# EAGLE board untitled (1) (EAGLE 9.6.2)
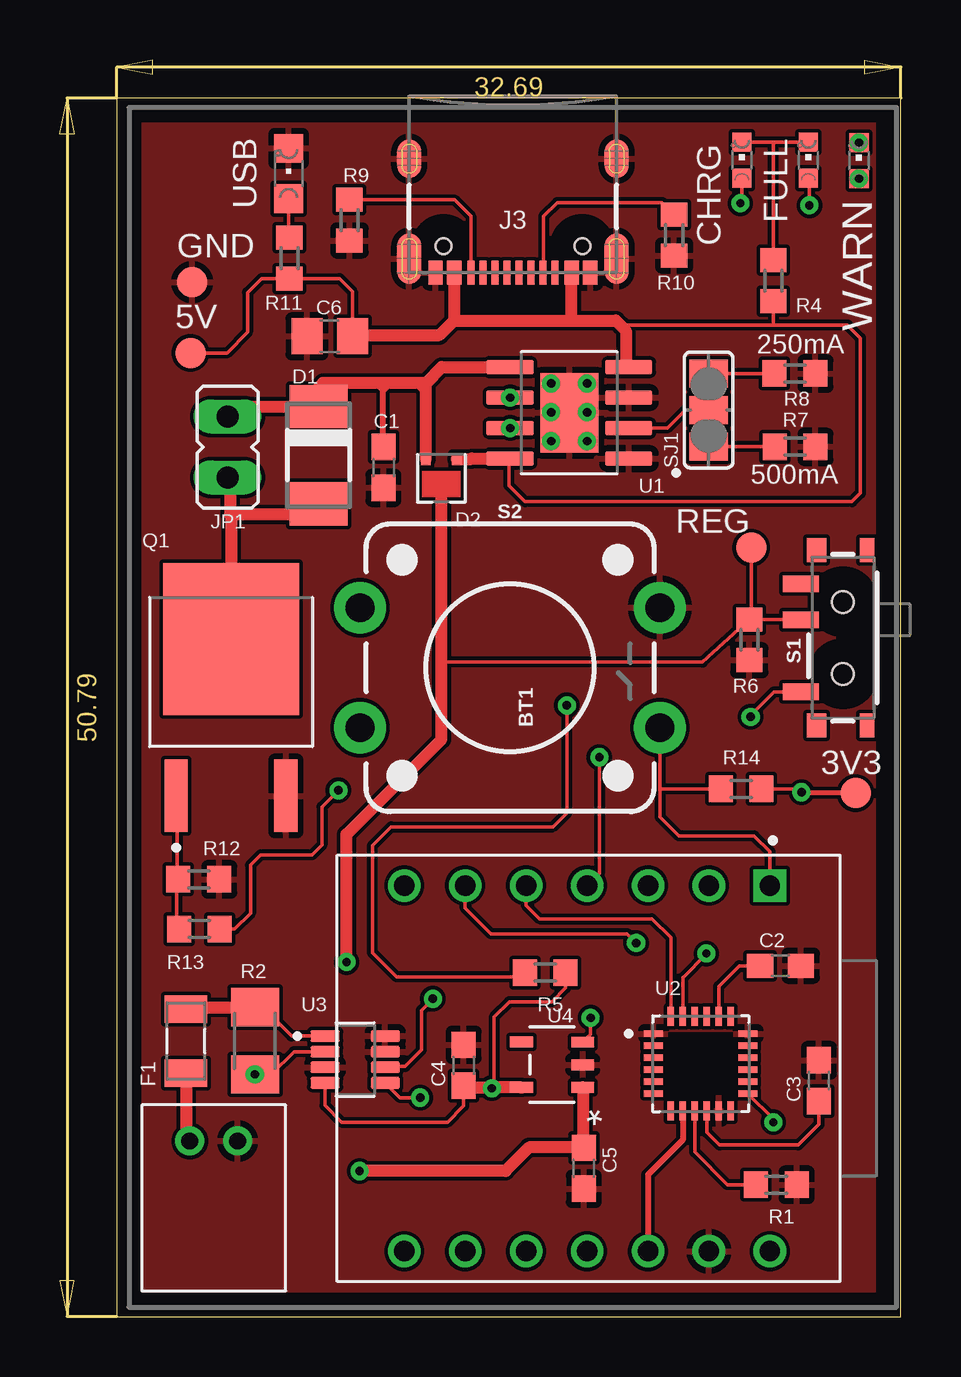
[diagram p0: board, top side]
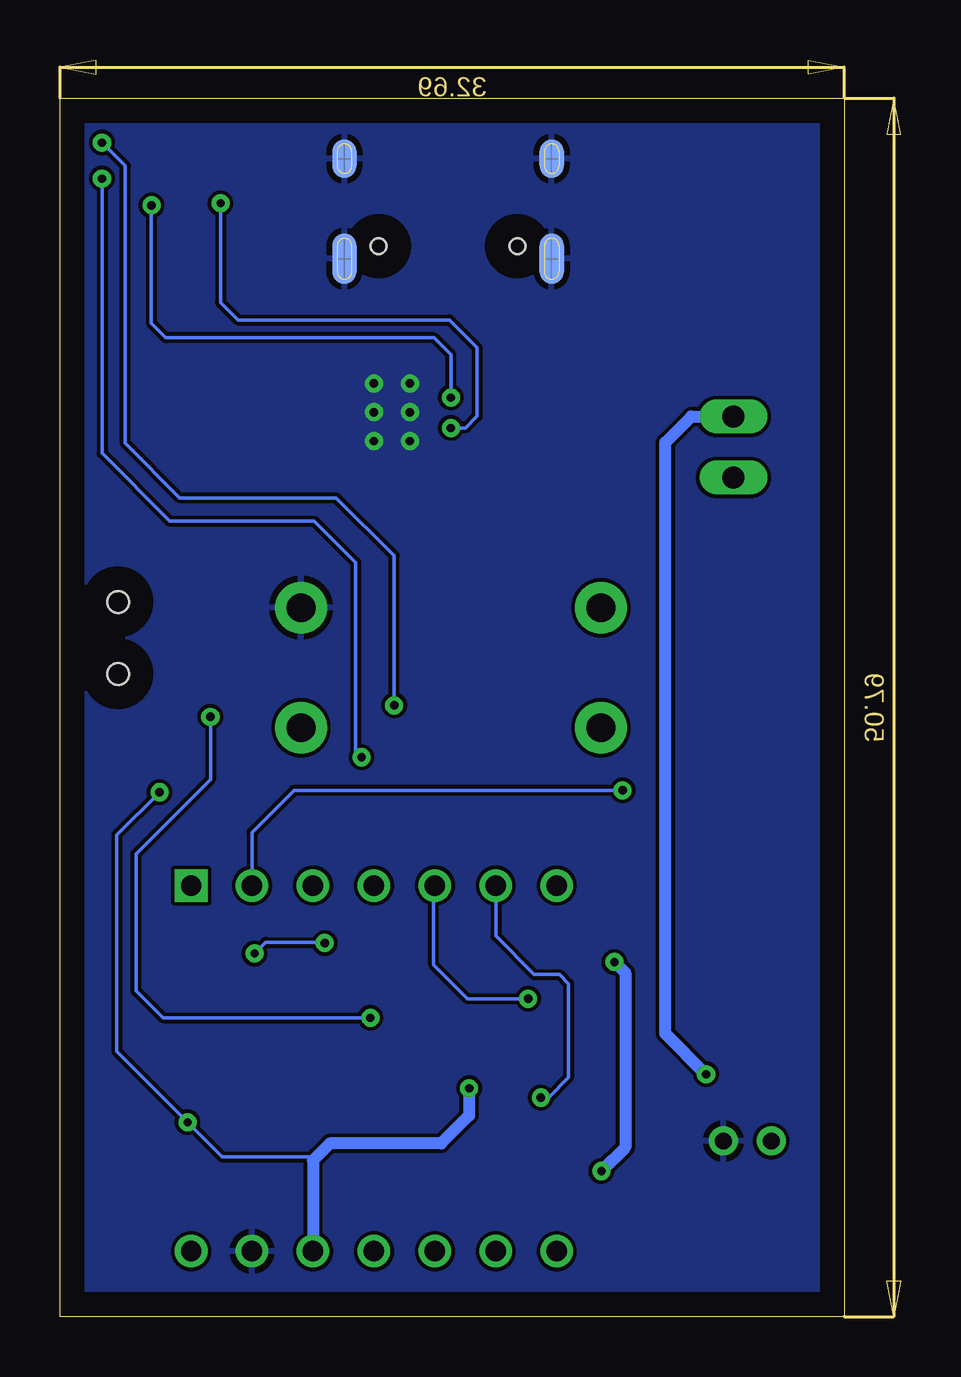
[diagram p1: board, bottom side, seen from below]

Size 32.69 x 50.79 mm. Coordinates in mm from the lower left corner, seen from the top.
Outline: 0,0 32.69,0 32.69,50.79 0,50.79 0,0
Copper layers (1*16): Top 0.035mm / dielectric 1.5mm / Bottom 0.035mm
Design rules "default": minimum track width 6mil, minimum drill 0.35mm, track to track 6mil, track to pad 6mil, pad to pad 6mil, via to via 6mil, smd to smd 6mil, copper to edge 40mil, drill to drill 6mil, minimum pad ring 10mil, minimum via ring 8mil, stop-mask expansion 4mil, vias tented up to drill 0mil, thermal gap 10mil

## Footprints (pad centres in the part's own frame; a part is rotated, then mirrored left to right if it is on the bottom)
B1,27 = smd 1.27 x 1.27: TP 0,0
C0603 = smd 1.1 x 1: 1 -0.85,0; 2 0.85,0
C0805 = smd 1.3 x 1.5: 1 -0.95,0; 2 0.95,0
CHIPLED_0603 = smd 0.8 x 0.8: A 0,-0.75; C 0,0.75
S2B-PH = drill 0.7: 1 -1,0; 2 1,0
DO-214AC = smd 1.8 x 2.4: A 2.025,0; C -2.025,0
SOT1061 = smd 0.4 x 0.5: 1 -0.65,-0.8; 2 0.65,-0.8 | smd 0 x 0: 3 0,0.875
C1Q250 = smd 1.14 x 1.78: 1 -1.33,0; 2 1.33,0
USB-C-16P-4LAYER-ISOLATED = smd 0.3 x 1: A5 -1.25,-0.34; A6 -0.25,-0.34; A7 0.25,-0.34; A8 1.25,-0.34; B5 1.75,-0.34; B6 0.75,-0.34; B7 -0.75,-0.34; B8 -1.75,-0.34 | smd 0.6 x 1: GND -3.225,-0.34; GND2 3.225,-0.34; VBUS1 -2.45,-0.34; VBUS2 2.45,-0.34 | smd 1 x 2.1: SHLD1 -4.32,-0.915; SHLD2 4.32,-0.915 | smd 1 x 2.1 bottom: SHLD3 -4.32,-0.915; SHLD4 4.32,-0.915 | smd 1 x 1.6: SHLD5 -4.32,-5.095; SHLD8 4.32,-5.095 | smd 1 x 1.6 bottom: SHLD6 -4.32,-5.095; SHLD7 4.32,-5.095 | hole 0.65: -2.89,-1.445; 2.89,-1.445
JP1 = drill 0.914 long: 1 0,-1.27; 2 0,1.27
DPAK228P994X240-4N = smd 0.97 x 3.02: 1 -2.286,-4.09; 3 2.286,-4.09 | smd 5.67 x 6.32: 4 0,2.44
R0603 = smd 1 x 1.1: 1 -0.85,0; 2 0.85,0
M1206 = smd 1.6 x 2: 1 -1.4,0; 2 1.4,0
SWITCH_SPST_SMD_A = smd 0.7 x 1.5: 1 -2.25,-1.75; 2 -0.75,-1.75; 3 2.25,-1.75 | smd 1 x 0.6: GND1 -3.65,1; GND3 3.65,1 | smd 1 x 0.8: GND2 -3.65,-1.1; GND4 3.65,-1.1 | hole 0.9: -1.5,0; 1.5,0
TACTILE_SWITCH_PTH_12MM = drill 1.2 pad 2.159: 1 6.25,-2.5; 2 -6.25,-2.5; 3 6.25,2.5; 4 -6.25,2.5
SJ_2 = smd 1.168 x 1.6: 1 -1.524,0; 2 0,0; 3 1.524,0
SOP127P600X175-9N = smd 1.97 x 0.6: 1 -2.475,1.905; 2 -2.475,0.635; 3 -2.475,-0.635; 4 -2.475,-1.905; 5 2.475,-1.905; 6 2.475,-0.635; 7 2.475,0.635; 8 2.475,1.905 | smd 2.413 x 3.302: 9 0,0
QFN50P400X400X95-24N = smd 0.79 x 0.28: 1 -1.97,1.25; 2 -1.97,0.75; 3 -1.97,0.25; 4 -1.97,-0.25; 5 -1.97,-0.75; 6 -1.97,-1.25; 13 1.97,-1.25; 14 1.97,-0.75; 15 1.97,-0.25; 16 1.97,0.25; 17 1.97,0.75; 18 1.97,1.25 | smd 0.28 x 0.79: 7 -1.25,-1.97; 8 -0.75,-1.97; 9 -0.25,-1.97; 10 0.25,-1.97; 11 0.75,-1.97; 12 1.25,-1.97; 19 1.25,1.97; 20 0.75,1.97; 21 0.25,1.97; 22 -0.25,1.97; 23 -0.75,1.97; 24 -1.25,1.97
SOT65P280X145-8N = smd 1.21 x 0.48: 1 -1.255,0.975; 2 -1.255,0.325; 3 -1.255,-0.325; 4 -1.255,-0.975; 5 1.255,-0.975; 6 1.255,-0.325; 7 1.255,0.325; 8 1.255,0.975
TSOT23-5_ONS = smd 0.953 x 0.457: 1 -1.276,0.94; 2 -1.276,0; 3 -1.276,-0.94; 4 1.276,-0.953; 5 1.276,0.953
MODULE_113991054 = drill 0.85 square: 1 -7.62,7.556 | drill 0.85: 2 -7.62,5.016; 3 -7.62,2.477; 4 -7.62,-0.064; 5 -7.62,-2.603; 6 -7.62,-5.144; 7 -7.62,-7.684; 8 7.62,-7.684; 9 7.62,-5.144; 10 7.62,-2.603; 11 7.62,-0.064; 12 7.62,2.477; 13 7.62,5.016; 14 7.62,7.556
CHIPLED_0805 = smd 1.2 x 1.2: A 0,-1.05; C 0,1.05

## Placement (x,y rotation side)
3V3  TPB1,27  [B1,27]  30.8,21.83 0 top
5V  TPB1,27  [B1,27]  3.07,40.17 0 top
BT1  LIPO-OUTLINE1000  [LIPO-1000]  16.51,25.4 0 top
C1  [C0603]  11.11,35.4 270 top
C2  [C0603]  27.66,14.63 0 top
C3  [C0603]  29.27,9.84 90 top
C4  [C0603]  14.46,10.48 90 top
C5  [C0603]  19.46,6.19 270 top
C6  0.1uf 50V  [C0805]  8.88,40.86 180 top
CHRG  [CHIPLED_0603]  26.05,48.21 0 top
CON1  PH_S2B-PH  [S2B-PH]  4.04,7.32 180 top
D1  [DO-214AC]  8.41,35.91 270 top
D2  PMEG2020CPA  [SOT1061]  13.53,34.95 180 top
F1  C1Q250  [C1Q250]  2.88,11.49 90 top
FULL  [CHIPLED_0603]  28.82,48.21 0 top
GND  TPB1,27  [B1,27]  3.14,43.12 0 top
J3  USB Female Type C Connector  [USB-C-16P-4LAYER-ISOLATED]  16.51,43.18 180 top
JP1  [JP1]  4.61,36.25 0 top
Q1  AOD4184A  [DPAK228P994X240-4N]  4.76,25.8 0 top
R1  [R0603]  27.49,5.5 180 top
R2  [M1206]  5.76,11.5 90 top
R4  2K4  [R0603]  27.37,43.19 90 top
R5  [R0603]  17.86,14.34 180 top
R6  100K  [R0603]  26.37,28.22 270 top
R7  2K4  [R0603]  28.27,36.26 180 top
R8  1K  [R0603]  28.27,39.31 180 top
R9  5K1  [R0603]  9.7,45.71 90 top
R10  5K1  [R0603]  23.23,45.08 90 top
R11  2K4  [R0603]  7.2,44.12 90 top
R12  10K  [R0603]  3.42,18.23 0 top
R13  100R  [R0603]  3.44,16.16 0 top
R14  10K  [R0603]  26.02,22 0 top
REG  TPB1,27  [B1,27]  26.44,32.05 180 top
S1  [SWITCH_SPST_SMD_A]  30.27,28.3 270 top
S2  MOMENTARY-SWITCH-SPST-PTH-12MM  [TACTILE_SWITCH_PTH_12MM]  16.39,27.05 0 top
SJ1  [SJ_2]  24.67,37.79 90 top
U1  TP4056  [SOP127P600X175-9N]  18.87,37.68 180 top
U2  MPU-6050-A  [QFN50P400X400X95-24N]  24.34,10.55 0 top
U3  INA219BIDCNR  [SOT65P280X145-8N]  9.94,10.72 0 top
U4  NCP718ASN330T1G  [TSOT23-5_ONS]  18.15,10.51 180 top
U6  113991054  [MODULE_113991054]  19.67,10.35 270 top
USB  GRN  [CHIPLED_0805]  7.16,47.65 0 top
WARN  [CHIPLED_0603]  30.94,48.19 0 top

## Library data of the parts
3V3 5V GND REG = testpad
BT1 = SparkFun-Batteries; PROD_ID: BATT-13243; SF_SKU: PRT-13813
C1-C5 CHRG FULL R1 R2 R4-R14 USB WARN = adafruit
C6 = rcl; SPICEPREFIX: C
CON1 = CASE-JST
D1 = diode
D2 = PMEG2020CPA; AVAILABILITY: In Stock; CHECK_PRICES: https://www.snapeda.com/parts/PMEG2020CPA/Nexperia/view-part/?ref=eda; DESCRIPTION: Diode Array 1 Pair Common Cathode Schottky 20V 2A Surface Mount 3-PowerUDFN; MF: Nexperia; MP: PMEG2020CPA; PACKAGE: PowerUDFN-3 NXP Semiconductors; PRICE: None; SNAPEDA_LINK: https://www.snapeda.com/parts/PMEG2020CPA/Nexperia/view-part/?ref=snap
F1 = Fuse; CREATED_BY: PCBLayout.com; DIGIKEY_PARTNO: 507-1073-1-ND; MANUFACTURER: Bel Fuse Inc.; MPN: C1Q 250
J3 = SparkFun-Connectors; PROD_ID: CONN-14122
JP1 SJ1 = jumper
Q1 = AOD4184A; AVAILABILITY: In Stock; CHECK_PRICES: https://www.snapeda.com/parts/AOD4184A/Alpha+%2526+Omega+Semiconductor+Inc./view-part/?ref=eda; DESCRIPTION: N-Channel 40 V 13A (Ta), 50A (Tc) 2.3W (Ta), 50W (Tc) Surface Mount TO-252 (DPAK); MF: Alpha & Omega Semiconductor Inc.; MP: AOD4184A; PACKAGE: None; PRICE: None; SNAPEDA_LINK: https://www.snapeda.com/parts/AOD4184A/Alpha+%2526+Omega+Semiconductor+Inc./view-part/?ref=snap
S1 = SparkFun-Switches; PROD_ID: SWCH-10651; SF_SKU: COM-10860
S2 = SparkFun-Switches; PROD_ID: SWCH-09185; SF_SKU: COM-09190
U1 = TP4056 (1); AVAILABILITY: Not in stock; CHECK_PRICES: https://www.snapeda.com/parts/TP4056/NanJing+Top+Power+ASIC+Corp./view-part/?ref=eda; DESCRIPTION: Complete single cell Li-Ion battery with a constant current / constant voltage linear charger; MF: NanJing Top Power ASIC Corp.; MP: TP4056; PACKAGE: Package; PRICE: None; SNAPEDA_LINK: https://www.snapeda.com/parts/TP4056/NanJing+Top+Power+ASIC+Corp./view-part/?ref=snap
U2 = MPU-6050-A; AVAILABILITY: In Stock; CHECK_PRICES: https://www.snapeda.com/parts/MPU-6050-A/TDK/view-part/?ref=eda; DESCRIPTION: MOTION TRACKING DEVICE; MF: TDK InvenSense; MP: MPU-6050-A; PACKAGE: QFN-24 InvenSense; PRICE: None; SNAPEDA_LINK: https://www.snapeda.com/parts/MPU-6050-A/TDK/view-part/?ref=snap
U3 = INA219BIDCNR; AVAILABILITY: In Stock; CHECK_PRICES: https://www.snapeda.com/parts/INA219BIDCNR/Texas+Instruments/view-part/?ref=eda; DESCRIPTION: 26-V 12-bit I2C output digital power monitor; MF: Texas Instruments; MP: INA219BIDCNR; PACKAGE: SOT-23-8 Texas Instruments; PRICE: None; PURCHASE-URL: https://www.snapeda.com/api/url_track_click_mouser/?unipart_id=870494&manufacturer=Texas Instruments&part_name=INA219BIDCNR&search_term=ina219; SNAPEDA_LINK: https://www.snapeda.com/parts/INA219BIDCNR/Texas+Instruments/view-part/?ref=snap
U4 = NCP718ASN330T1G; AVAILABILITY: In Stock; CHECK_PRICES: https://www.snapeda.com/parts/NCP718ASN330T1G/Onsemi/view-part/?ref=eda; DESCRIPTION: Linear Voltage Regulator IC Positive Fixed 1 Output 300mA TSOT-23-5; MF: onsemi; MP: NCP718ASN330T1G; PACKAGE: TSOT-23-5 ON Semiconductor; PRICE: None; SNAPEDA_LINK: https://www.snapeda.com/parts/NCP718ASN330T1G/Onsemi/view-part/?ref=snap
U6 = 113991054; AVAILABILITY: In Stock; CHECK_PRICES: https://www.snapeda.com/parts/113991054/Seeed+Studio/view-part/?ref=eda; DESCRIPTION: - ESP32-C3 Transceiver; 802.11 a/b/g/n (Wi-Fi, WiFi, WLAN), Bluetooth® Smart 4.x Low Energy (BLE) 2.4GHz Evaluation Board; MF: Seeed Technology Co., Ltd; MP: 113991054; PACKAGE: None; PRICE: None; SNAPEDA_LINK: https://www.snapeda.com/parts/113991054/Seeed+Studio/view-part/?ref=snap

## Nets
3.3V: 3V3.TP C4.1 R5.1 R14.2 U2.8 U2.13 U3.4 U4.5 U6.12
+5V/1: 5V.TP C6.1 D2.1 J3.VBUS1 J3.VBUS2 R4.1 R11.1 U1.4 U1.8
CHRG: CHRG.A U1.7
FULL: FULL.A U1.6
GND: C1.2 C2.2 C3.2 C4.2 C5.2 C6.2 CON1.1 GND.TP J3.GND J3.GND2 J3.SHLD1 J3.SHLD2 J3.SHLD3 J3.SHLD4 J3.SHLD5 J3.SHLD6 J3.SHLD7 J3.SHLD8 Q1.3 R1.1 R6.2 R7.1 R8.1 R9.1 R10.1 R12.2 S2.3 U1.1 U1.3 U1.9 U2.1 U2.11 U2.18 U3.3 U3.7 U3.8 U4.2 U6.13 USB.C
N$1: C5.1 D2.3 R6.1 REG.TP S1.2 U4.1
N$2: CHRG.C FULL.C R4.2
N$3: U2.23 U3.5 U6.6
N$4: R13.2 U6.2
N$6: R14.1 S2.1 U6.1
N$7: F1.2 R2.2 U3.1
N$8: C3.1 U2.10
N$9: C2.1 U2.20
N$10: D1.A JP1.1 Q1.4
N$11: CON1.2 F1.1
N$12: R1.2 U2.9
N$13: R5.2 WARN.C
N$14: U6.4 WARN.A
N$15: S1.3 U4.3
N$16: J3.A5 R10.2
N$18: R7.2 SJ1.1
N$19: J3.B5 R9.2
N$21: R8.2 SJ1.3
N$22: SJ1.2 U1.2
N$24: U2.24 U3.6 U6.5
N$26: R11.2 USB.A
N$41: Q1.1 R12.1 R13.1
V_BATT: C1.1 D1.C D2.2 JP1.2 R2.1 U1.5 U3.2
VUSB: U6.14

## Tracks (layer width: path | path; a pad name or v marks a point on that pad's centre or on a via)
3.3V  (via drill 0.35)
  Top 0.152: R5.1 18.71,13.71 18.13,13.13 16.37,13.13 15.73,12.49 15.73,9.52 | U2.13 27.37,8.24 v27.37,8.1 | R14.2 28.4,22 v28.54,21.86 | U3.4 8.68,8.8 9.38,8.11 13.78,8.11 14.46,8.79 C4.1
  Top 0.203: 3V3.TP 28.57,21.83 v28.54,21.86
  Top 0.254: U2.8 23.59,7.37 22.14,5.92 U6.12
  Top 0.508: v15.63,9.52 15.62,9.54 14.55,9.54 C4.1 | v15.63,9.52 15.73,9.52 | v15.63,9.52 15.67,9.56 U4.5
  Bottom 0.152: 22,6.66 25.93,6.66 v27.37,8.1 30.32,11.05 30.32,20.09 v28.54,21.86
  Bottom 0.508: v15.63,9.52 15.63,8.39 16.8,7.23 21.43,7.23 22,6.66 22.14,6.52 U6.12
+5V/1
  Top 0.152: 16.34,35.77 16.34,34.65 17.02,33.97 30.64,33.97 31,34.33 31,40.8 30.46,41.34 27.32,41.34 | C6.1 9.82,42.72 9.28,43.27 R11.1 6.04,43.27 5.45,42.69 5.45,41.03 4.59,40.17 5V.TP | 21.01,41.31 21.03,41.34 27.32,41.34 | R4.1 27.37,41.39 27.32,41.34
  Top 0.508: U1.4 21.22,39.71 21.22,41.1 21.01,41.31 20.8,41.52 18.96,41.52 | 18.96,41.52 J3.VBUS1 | C6.1 9.88,40.92 13.45,40.92 14.05,41.52 | 14.05,41.52 18.96,41.52 | J3.VBUS2 14.06,41.53 14.05,41.52 | U1.8 16.34,35.77 14.8,35.77 14.79,35.76 D2.1
CHRG  (via drill 0.35)
  Top 0.152: CHRG.A 26.05,46.47 v25.99,46.41
  Bottom 0.152: v25.99,46.41 25.99,42.28 25.26,41.54 16.45,41.54 15.3,40.38 15.3,37.53 15.79,37.04 U1.7
  other vias: 16.39,37.04
FULL  (via drill 0.35)
  Top 0.152: FULL.A 28.87,47.41 v28.87,46.33
  Bottom 0.152: U1.6 16.39,40.1 17.1,40.81 28.28,40.81 28.88,41.42 28.88,46.31 v28.87,46.33
  other vias: 16.39,38.31
GND  (via drill 0.35)
  other vias: 18.1,38.9 18.1,37.7 18.1,36.5 19.6,38.9 19.6,37.7 19.6,36.5
  pour Top: 0.19,50.62 32.52,50.62 32.52,0.18 0.2,0.18 0.2,50.62
  pour Bottom: 0.16,50.88 32.53,50.88 32.53,0.19 0.16,0.19 0.16,50.88
N$1  (via drill 0.35)
  Top 0.152: S1.2 R6.1 | R6.1 24.41,27.29 13.53,27.29 | REG.TP 26.44,29.14 R6.1
  Top 0.203: 13.62,32.84 13.53,32.76
  Top 0.508: U4.1 19.42,7.08 C5.1 19.45,7.05 17.18,7.05 16.2,6.07 v10.12,6.07 | v9.58,14.79 9.58,20.11 13.53,24.06 13.53,27.29 13.53,32.76 D2.3
  Bottom 0.508: v9.58,14.79 9.13,14.33 9.13,7.06 v10.12,6.07
N$2
  Top 0.152: FULL.C | FULL.C 27.44,48.95 | 27.44,48.95 CHRG.C | R4.2 27.37,48.88 27.44,48.95
N$3  (via drill 0.35)
  Top 0.152: U2.23 23.59,14.13 | 23.59,14.13 | v21.65,15.58 21.27,15.96 15.6,15.96 14.52,17.03 U6.6 | v24.58,15.14 24.58,15.12 23.59,14.13 | v12.64,9.13 11.81,9.13 U3.5
  Bottom 0.152: v24.58,15.14 24.11,15.61 21.68,15.61 v21.65,15.58 | U6.6 14.52,15.87 12.92,14.27 11.87,14.27 11.48,13.88 11.48,9.98 12.33,9.13 v12.64,9.13
N$4  (via drill 0.35)
  Top 0.152: v9.24,21.94 8.55,21.25 8.55,19.66 8.14,19.25 6,19.25 5.58,18.83 5.58,16.82 4.92,16.16 R13.2
  Bottom 0.152: U6.2 24.68,20.19 22.93,21.94 v9.24,21.94
N$6
  Top 0.152: U6.1 27.22,19.39 26.57,20.04 23.42,20.04 22.64,20.82 22.64,22.07 | S2.1 22.64,22.07 | R14.1 22.71,22 22.64,22.07
N$7
  Top 0.152: U3.1 7.28,11.7 6.07,12.9 5.78,12.9 R2.2
  Top 0.508: F1.2 2.96,12.9 5.78,12.9
N$8
  Top 0.152: C3.1 29.27,8.02 28.41,7.16 25.12,7.16 24.59,7.68 U2.10
N$9
  Top 0.152: U2.20 25.09,13.77 25.95,14.63 C2.1
N$10
  Top 0.508: JP1.1 4.72,34.87 4.72,33.43 4.76,33.43 | 4.76,33.43 Q1.4 | D1.A 7.96,33.43 4.76,33.43
N$11
  Top 0.508: CON1.2 2.89,7.47 2.89,10.15 F1.1
N$12
  Top 0.152: R1.2 25.45,5.5 24.09,6.87 U2.9
N$13  (via drill 0.35)
  Top 0.152: R5.2 16.54,14.17 11.66,14.17 10.65,15.17 10.65,19.64 11.43,20.42 18.18,20.42 18.76,21 v18.76,25.48
  Bottom 0.152: v18.76,25.48 18.76,31.72 21.17,34.13 27.69,34.13 29.97,36.41 29.97,47.97 WARN.C
  other vias: 30.94,48.94
N$14  (via drill 0.35)
  Top 0.152: v20.12,23.32 20.12,18.49 U6.4
  Bottom 0.152: WARN.A 30.94,35.99 28.11,33.16 22.09,33.16 20.37,31.44 20.37,23.57 v20.12,23.32
  other vias: 30.94,47.44
N$15  (via drill 0.35)
  Top 0.152: S1.3 27.4,26.05 26.38,25.04 v26.42,25 | v19.75,12.46 19.75,11.77 U4.3
  Bottom 0.152: v26.42,25 26.42,22.4 29.52,19.3 29.52,13.58 28.39,12.46 v19.75,12.46
N$16
  Top 0.152: R10.2 22.73,46.44 18.36,46.44 17.79,45.87 17.79,43.55 J3.A5
N$18
  Top 0.152: R7.2 SJ1.1
N$19
  Top 0.152: R9.2 14.07,46.56 14.76,45.87 J3.B5
N$21
  Top 0.152: R8.2 SJ1.3
N$22
  Top 0.152: SJ1.2 23.7,37.79 22.95,37.04 U1.2
N$24  (via drill 0.35)
  Top 0.152: U6.5 17.06,17.15 17.62,16.59 22.31,16.59 23.09,15.81 U2.24 | U3.6 11.23,10.43 12.02,10.43 12.7,11.11 12.7,12.77 v13.18,13.25
  Bottom 0.152: v13.18,13.25 15.69,13.25 17.11,14.68 17.11,17.92 U6.5
N$26
  Top 0.152: USB.A 7.16,45.01 R11.2
N$41
  Top 0.152: Q1.1 2.51,21.68 2.51,18.28 R12.1 2.5,18.16 2.5,16.25 R13.1
V_BATT  (via drill 0.35)
  Top 0.152: U3.2 7.38,11.05 6.44,10.1 R2.1
  Top 0.254: C1.1 11.11,38.78
  Top 0.508: D2.2 12.88,38.92 | 12.88,38.92 13.54,39.58 U1.5 | 12.74,38.78 12.88,38.92 | JP1.2 5.02,37.93 D1.C 8.41,38.73 8.6,38.92 11.07,38.92 | 12.88,38.92 11.07,38.92 | 11.11,38.78 11.11,38.88 11.07,38.92
  Bottom 0.508: JP1.2 6.38,37.52 7.46,36.44 7.46,11.81 R2.1
  other vias: 5.76,10.1

## Text on the board
tPlace: 250mA | 500mA